# Altium PCB N050-8848TSWYG02-H14.pcbdoc
Units mm, origin at the board's own origin, x right, y up, seen from the top; angles counter-clockwise.
Board outline 21.69 x 30.8 mm, 2 copper layers (Top Layer, Bottom Layer), stack 0 mm thick; 1 components, 0 nets, 14 pads, 0 vias.
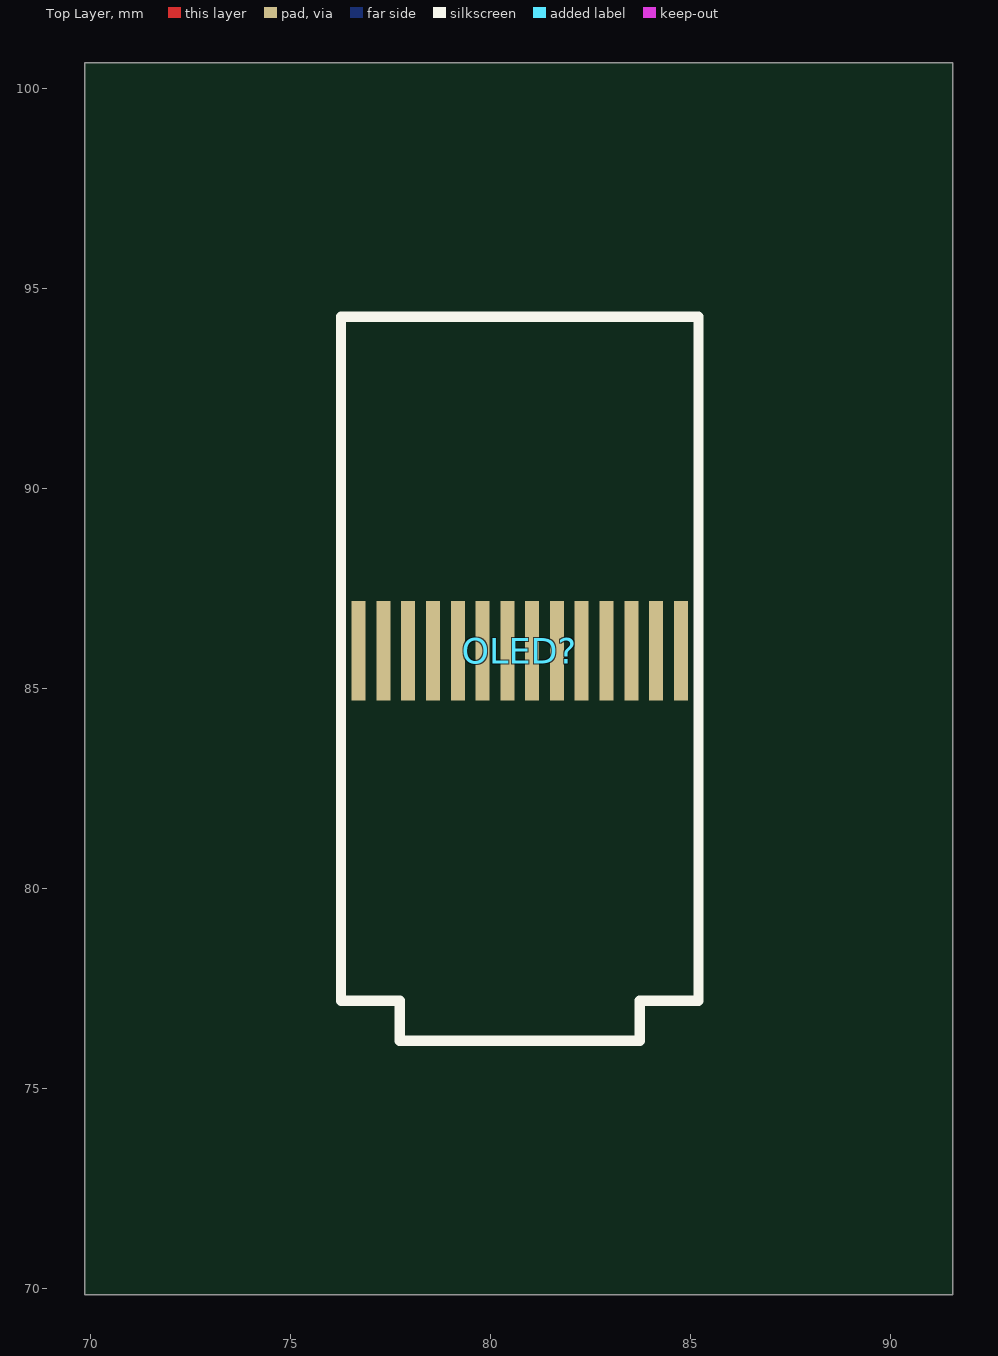
[diagram p0: Top Layer view]
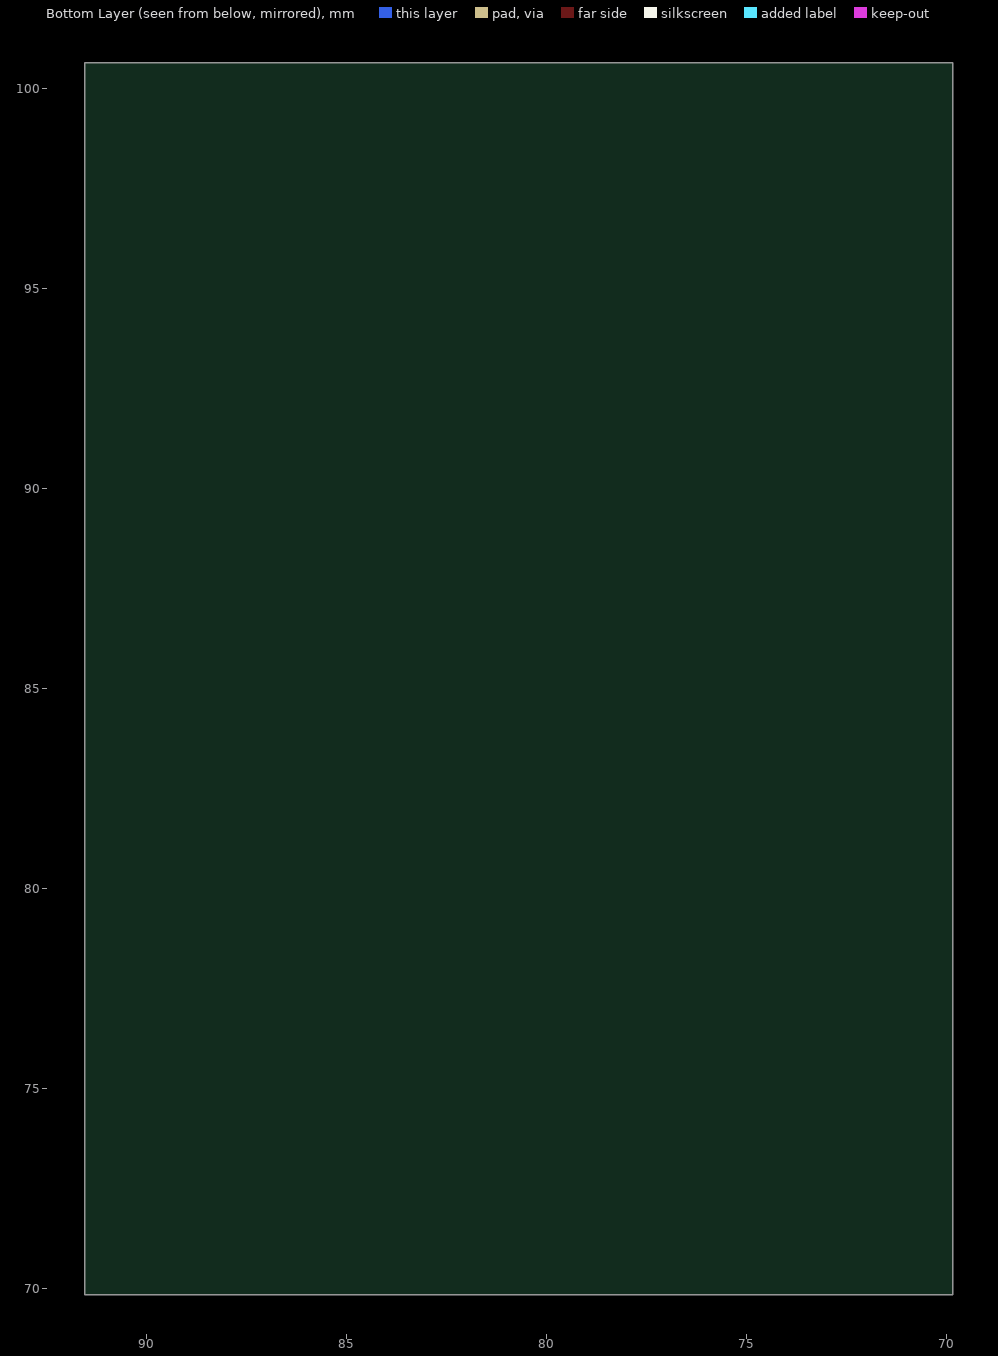
[diagram p1: Bottom Layer view, seen from below]

## Layer stack, top to bottom
Top Layer: signal copper (thickness not stored)
Bottom Layer: signal copper (thickness not stored)

## Board outline
91.544,69.85 69.85,69.85 69.85,100.65 91.544,100.65

## Components (designator, comment, footprint, x,y, rotation, side; value= is the part's Value field where it differs from the comment)
OLED? "N050-8848TSWYG02-H14" OLED-SMD_N050-8848TSWYG02-H14 80.724,85.951 r0 top

## Footprints (in the part's own frame and the unit in brackets; to place one, negate y for a bottom-side part, rotate by r counter-clockwise, add the part's x,y. Pads: shape width x height; smd on the part's side, far side on the other; paste and mask are expansions set on the pad)
OLED-SMD_N050-8848TSWYG02-H14 [mil]
  rect 13.8x98.4 smd: 1(-158.6,0) 2(-134.2,0) 3(-109.8,0) 4(-85.4,0) 5(-61,0) 6(-36.6,0) 7(-12.2,0) 8(12.2,0) 9(36.6,0) 10(61,0) 11(85.4,0) 12(109.9,0) 13(134.3,0) 14(158.7,0)
  silkscreen extent -176,-384 176,329

## Nets (pads, with @x,y where several pads share a name; then routed paths per layer and width w, separated by ;. In a path a pad name is that pad's centre, name@x,y a point inside that pad or via, vN(x,y) a via of type N, cw(c..) or ccw(c..) an arc to the next point about the centre after c; other vN are vias at no path point)
pads on no net: OLED?.1 OLED?.2 OLED?.3 OLED?.4 OLED?.5 OLED?.6 OLED?.7 OLED?.8 OLED?.9 OLED?.10 OLED?.11 OLED?.12 OLED?.13 OLED?.14